# Altium PCB 1-LightingAndSolenoidValve.PcbDoc (part 3 of 3)
Units mm, origin at the board's own origin, x right, y up, seen from the top; angles counter-clockwise.
Board outline 272 x 85 mm, 2 copper layers (Top Layer, Bottom Layer); 366 components, 221 nets, 1073 pads, 653 vias.
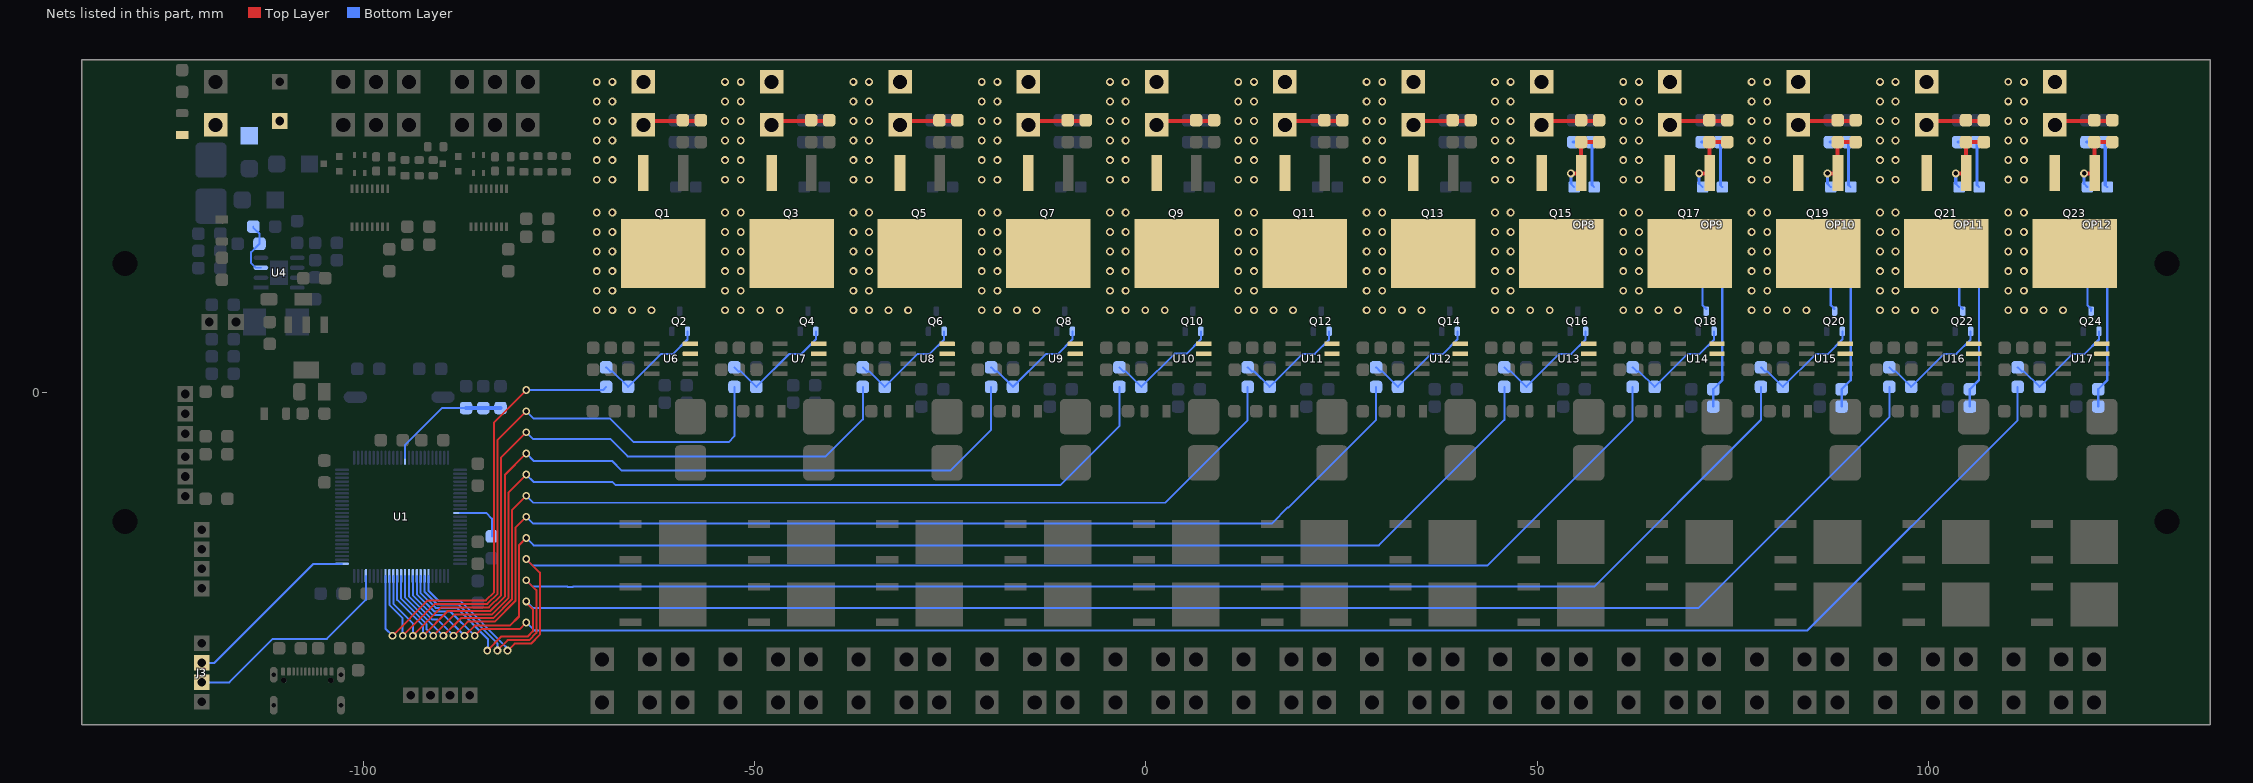
[diagram p3: the nets of this part, all layers, seen from the top]

## Via types
v1: diameter 1, hole 0.6, Top Layer to Bottom Layer, tented both sides, 648 vias
v2: diameter 1.2, hole 0.6, Top Layer to Bottom Layer, tented both sides, 4 vias
v3: diameter 1.2, hole 0.7, Top Layer to Bottom Layer, tented both sides, 1 vias

## Nets (pads, with @x,y where several pads share a name; then routed paths per layer and width w, separated by ;. In a path a pad name is that pad's centre, name@x,y a point inside that pad or via, vN(x,y) a via of type N, cw(c..) or ccw(c..) an arc to the next point about the centre after c; other vN are vias at no path point) (continued)
NetOP8_3: OP8.3 Q15.1 R82.2 R83.2 | length 9.6
  Top Layer w0.254: Q15.1@55.596,28 Q15.1@55.642,28.046 Q15.1@55.6,28.088
  Top Layer w0.5: v1(54.3,28) Q15.1@55.596,28 ; Q15.1@55.6,28.088 R82.2@55.6,32 R83.2@57.9,32
  Bottom Layer w0.254: OP8.3@54.3,26.68 OP8.3@54.73,26.25
  Bottom Layer w0.4: OP8.3@54.3,26.68 v1(54.3,28)
NetOP8_4: OP8.4 R86.1 R87.1 | length 8.2
  Bottom Layer w0.254: R86.1@56.9,32 R86.1@57.006,31.894 ; OP8.4@57.006,26.514 OP8.4@57.27,26.25
  Bottom Layer w0.4: R87.1@54.6,32 R86.1@56.9,32 ; OP8.4@57.006,26.514 R86.1@57.006,31.894
NetOP9_1: OP9.1 R93.1 R94.1 | length 18.7
  Bottom Layer w0.3: R94.1@72.5,-1.8 R93.1@72.5,0.4 73.67,1.57 OP9.1@73.67,16.45
NetOP9_2: OP9.2 Q18.3 | length 6
  Bottom Layer w0.3: OP9.2@71.13,16.45 71.13,11.146 Q18.3@71.6,10.676
NetOP9_3: OP9.3 Q17.1 R91.2 R92.2 | length 9.6
  Top Layer w0.254: Q17.1@71.996,28 Q17.1@72.042,28.046 Q17.1@72,28.088
  Top Layer w0.5: v1(70.7,28) Q17.1@71.996,28 ; Q17.1@72,28.088 R91.2@72,32 R92.2@74.3,32
  Bottom Layer w0.254: OP9.3@70.7,26.68 OP9.3@71.13,26.25
  Bottom Layer w0.4: OP9.3@70.7,26.68 v1(70.7,28)
NetOP9_4: OP9.4 R95.1 R96.1 | length 8.2
  Bottom Layer w0.254: R95.1@73.3,32 R95.1@73.406,31.894 ; OP9.4@73.406,26.514 OP9.4@73.67,26.25
  Bottom Layer w0.4: R96.1@71,32 R95.1@73.3,32 ; OP9.4@73.406,26.514 R95.1@73.406,31.894
NetOP10_1: OP10.1 R102.1 R103.1 | length 18.7
  Bottom Layer w0.3: R103.1@88.9,-1.8 R102.1@88.9,0.4 90.07,1.57 OP10.1@90.07,16.45
NetOP10_2: OP10.2 Q20.3 | length 6
  Bottom Layer w0.3: OP10.2@87.53,16.45 87.53,11.146 Q20.3@88,10.676
NetOP10_3: OP10.3 Q19.1 R100.2 R101.2 | length 9.6
  Top Layer w0.254: Q19.1@88.396,28 Q19.1@88.442,28.046 Q19.1@88.4,28.088
  Top Layer w0.5: v1(87.1,28) Q19.1@88.396,28 ; Q19.1@88.4,28.088 R100.2@88.4,32 R101.2@90.7,32
  Bottom Layer w0.254: OP10.3@87.1,26.68 OP10.3@87.53,26.25
  Bottom Layer w0.4: OP10.3@87.1,26.68 v1(87.1,28)
NetOP10_4: OP10.4 R104.1 R105.1 | length 8.2
  Bottom Layer w0.254: R104.1@89.7,32 R104.1@89.806,31.894 ; OP10.4@89.806,26.514 OP10.4@90.07,26.25
  Bottom Layer w0.4: R105.1@87.4,32 R104.1@89.7,32 ; OP10.4@89.806,26.514 R104.1@89.806,31.894
NetOP11_1: OP11.1 R111.1 R112.1 | length 18.7
  Bottom Layer w0.3: R112.1@105.3,-1.8 R111.1@105.3,0.4 106.47,1.57 OP11.1@106.47,16.45
NetOP11_2: OP11.2 Q22.3 | length 6
  Bottom Layer w0.3: OP11.2@103.93,16.45 103.93,11.146 Q22.3@104.4,10.676
NetOP11_3: OP11.3 Q21.1 R109.2 R110.2 | length 9.4
  Top Layer w0.5: v1(103.5,28) Q21.1@104.796,28 ; Q21.1@104.8,28.088 R109.2@104.8,32 R110.2@107.1,32
  Bottom Layer w0.254: OP11.3@103.5,26.68 OP11.3@103.93,26.25
  Bottom Layer w0.4: OP11.3@103.5,26.68 v1(103.5,28)
NetOP11_4: OP11.4 R113.1 R114.1 | length 8.2
  Bottom Layer w0.254: R113.1@106.1,32 R113.1@106.206,31.894 ; OP11.4@106.206,26.514 OP11.4@106.47,26.25
  Bottom Layer w0.4: R114.1@103.8,32 R113.1@106.1,32 ; OP11.4@106.206,26.514 R113.1@106.206,31.894
NetOP12_1: OP12.1 R120.1 R121.1 | length 18.7
  Bottom Layer w0.3: R121.1@121.7,-1.8 R120.1@121.7,0.4 122.87,1.57 OP12.1@122.87,16.45
NetOP12_2: OP12.2 Q24.3 | length 6.2
  Bottom Layer w0.254: Q24.3@120.8,10.4 Q24.3@120.8,10.676
  Bottom Layer w0.3: OP12.2@120.33,16.45 120.33,11.146 Q24.3@120.8,10.676
NetOP12_3: OP12.3 Q23.1 R118.2 R119.2 | length 9.6
  Top Layer w0.254: Q23.1@121.196,28 Q23.1@121.242,28.046 Q23.1@121.2,28.088
  Top Layer w0.5: v1(119.9,28) Q23.1@121.196,28 ; Q23.1@121.2,28.088 R118.2@121.2,32 R119.2@123.5,32
  Bottom Layer w0.254: OP12.3@119.9,26.68 OP12.3@120.33,26.25
  Bottom Layer w0.4: OP12.3@119.9,26.68 v1(119.9,28)
NetOP12_4: OP12.4 R122.1 R123.1 | length 8.2
  Bottom Layer w0.254: R122.1@122.5,32 R122.1@122.606,31.894 ; OP12.4@122.606,26.514 OP12.4@122.87,26.25
  Bottom Layer w0.4: R123.1@120.2,32 R122.1@122.5,32 ; OP12.4@122.606,26.514 R122.1@122.606,31.894
NetP1_1: P1.1 P1.2 Q1.3 R19.1 R20.1 | length 7.5
  Top Layer w0.254: R19.1@-57.009,34.691 R19.1@-56.9,34.8 R19.1@-57.009,34.691
  Top Layer w0.5: P1.2@-64.238,34.691 R19.1@-57.009,34.691
  other v1: -70.2,27.191 -68.2,27.191 -70.2,29.691 -68.2,29.691 -70.2,32.191 -68.2,32.191 -70.2,34.691 -68.2,34.691 -70.2,37.191 -68.2,37.191 -70.2,39.691 -68.2,39.691
NetP2_1: P2.1 P2.2 Q3.3 R28.1 R29.1 | length 7.5
  Top Layer w0.254: R28.1@-40.609,34.691 R28.1@-40.5,34.8 R28.1@-40.609,34.691
  Top Layer w0.5: P2.2@-47.838,34.691 R28.1@-40.609,34.691
  other v1: -53.8,27.191 -51.8,27.191 -53.8,29.691 -51.8,29.691 -53.8,32.191 -51.8,32.191 -53.8,34.691 -51.8,34.691 -53.8,37.191 -51.8,37.191 -53.8,39.691 -51.8,39.691
NetP3_1: P3.1 P3.2 Q5.3 R37.1 R38.1 | length 7.5
  Top Layer w0.254: R37.1@-24.209,34.691 R37.1@-24.1,34.8 R37.1@-24.209,34.691
  Top Layer w0.5: P3.2@-31.438,34.691 R37.1@-24.209,34.691
  other v1: -37.4,27.191 -35.4,27.191 -37.4,29.691 -35.4,29.691 -37.4,32.191 -35.4,32.191 -37.4,34.691 -35.4,34.691 -37.4,37.191 -35.4,37.191 -37.4,39.691 -35.4,39.691
NetP4_1: P4.1 P4.2 Q7.3 R46.1 R47.1 | length 7.5
  Top Layer w0.254: R47.1@-7.809,34.691 R47.1@-7.7,34.8 R47.1@-7.809,34.691
  Top Layer w0.5: P4.2@-15.038,34.691 R47.1@-7.809,34.691
  other v1: -21,27.191 -19,27.191 -21,29.691 -19,29.691 -21,32.191 -19,32.191 -21,34.691 -19,34.691 -21,37.191 -19,37.191 -21,39.691 -19,39.691
NetP5_1: P5.1 P5.2 Q9.3 R55.1 R56.1 | length 7.5
  Top Layer w0.254: R56.1@8.591,34.691 R56.1@8.7,34.8 R56.1@8.591,34.691
  Top Layer w0.5: P5.2@1.362,34.691 R56.1@8.591,34.691
  other v1: -4.6,27.191 -2.6,27.191 -4.6,29.691 -2.6,29.691 -4.6,32.191 -2.6,32.191 -4.6,34.691 -2.6,34.691 -4.6,37.191 -2.6,37.191 -4.6,39.691 -2.6,39.691
NetP6_1: P6.1 P6.2 Q11.3 R64.1 R65.1 | length 7.5
  Top Layer w0.254: R65.1@24.991,34.691 R65.1@25.1,34.8 R65.1@24.991,34.691
  Top Layer w0.5: P6.2@17.762,34.691 R65.1@24.991,34.691
  other v1: 11.8,27.191 13.8,27.191 11.8,29.691 13.8,29.691 11.8,32.191 13.8,32.191 11.8,34.691 13.8,34.691 11.8,37.191 13.8,37.191 11.8,39.691 13.8,39.691
NetP7_1: P7.1 P7.2 Q13.3 R73.1 R74.1 | length 7.5
  Top Layer w0.254: R74.1@41.391,34.691 R74.1@41.5,34.8 R74.1@41.391,34.691
  Top Layer w0.5: P7.2@34.162,34.691 R74.1@41.391,34.691
  other v1: 28.2,27.191 30.2,27.191 28.2,29.691 30.2,29.691 28.2,32.191 30.2,32.191 28.2,34.691 30.2,34.691 28.2,37.191 30.2,37.191 28.2,39.691 30.2,39.691
NetP8_1: P8.1 P8.2 Q15.3 R82.1 R83.1 | length 7.5
  Top Layer w0.254: R83.1@57.791,34.691 R83.1@57.9,34.8 R83.1@57.791,34.691
  Top Layer w0.5: P8.2@50.562,34.691 R83.1@57.791,34.691
  other v1: 44.6,27.191 46.6,27.191 44.6,29.691 46.6,29.691 44.6,32.191 46.6,32.191 44.6,34.691 46.6,34.691 44.6,37.191 46.6,37.191 44.6,39.691 46.6,39.691
NetP9_1: P9.1 P9.2 Q17.3 R91.1 R92.1 | length 7.5
  Top Layer w0.254: R92.1@74.191,34.691 R92.1@74.3,34.8 R92.1@74.191,34.691
  Top Layer w0.5: P9.2@66.962,34.691 R92.1@74.191,34.691
  other v1: 61,27.191 63,27.191 61,29.691 63,29.691 61,32.191 63,32.191 61,34.691 63,34.691 61,37.191 63,37.191 61,39.691 63,39.691
NetP10_1: P10.1 P10.2 Q19.3 R100.1 R101.1 | length 7.4
  Top Layer w0.254: R101.1@90.591,34.691 R101.1@90.7,34.8
  Top Layer w0.5: P10.2@83.362,34.691 R101.1@90.591,34.691
  other v1: 77.4,27.191 79.4,27.191 77.4,29.691 79.4,29.691 77.4,32.191 79.4,32.191 77.4,34.691 79.4,34.691 77.4,37.191 79.4,37.191 77.4,39.691 79.4,39.691
NetP11_1: P11.1 P11.2 Q21.3 R109.1 R110.1 | length 7.4
  Top Layer w0.254: R110.1@106.991,34.691 R110.1@107.1,34.8
  Top Layer w0.5: P11.2@99.762,34.691 R110.1@106.991,34.691
  other v1: 93.8,27.191 95.8,27.191 93.8,29.691 95.8,29.691 93.8,32.191 95.8,32.191 93.8,34.691 95.8,34.691 93.8,37.191 95.8,37.191 93.8,39.691 95.8,39.691
NetP12_1: P12.1 P12.2 Q23.3 R118.1 R119.1 | length 7.4
  Top Layer w0.254: R119.1@123.391,34.691 R119.1@123.5,34.8
  Top Layer w0.5: P12.2@116.162,34.691 R119.1@123.391,34.691
  other v1: 112.2,27.191 110.2,27.2 110.2,29.7 112.2,29.691 110.2,32.2 112.2,32.191 112.2,34.691 110.2,34.7 110.2,37.2 112.2,37.191 112.2,39.691 110.2,39.7
NetQ1_2: Q1.2 U6.3 U6.4
  other v1: -70.2,10.5 -68.2,10.5 -65.7,10.5 -63.2,10.5 -70.2,13 -68.2,13 -70.2,15.5 -68.2,15.5 -70.2,18 -68.2,18 -70.2,20.5 -68.2,20.5 -70.2,23 -68.2,23
NetQ2_1: Q2.1 R25.2 R26.1 | length 15
  Bottom Layer w0.254: R26.1@-69,3.2 -68.496,2.696 -68.196,2.696 R25.2@-66.2,0.7 -61.965,4.935 -60.428,4.935 -58.6,6.763 Q2.1@-58.6,7.8
NetQ3_2: Q3.2 U7.3 U7.4
  other v1: -53.8,10.5 -51.8,10.5 -49.3,10.5 -46.8,10.5 -53.8,13 -51.8,13 -53.8,15.5 -51.8,15.5 -53.8,18 -51.8,18 -53.8,20.5 -51.8,20.5 -53.8,23 -51.8,23
NetQ4_1: Q4.1 R34.2 R35.1 | length 15
  Bottom Layer w0.254: R35.1@-52.6,3.2 -52.096,2.696 -51.796,2.696 R34.2@-49.8,0.7 -45.565,4.935 -44.028,4.935 -42.2,6.763 Q4.1@-42.2,7.8
NetQ5_2: Q5.2 U8.3 U8.4
  other v1: -37.4,10.5 -35.4,10.5 -32.9,10.5 -30.4,10.5 -37.4,13 -35.4,13 -37.4,15.5 -35.4,15.5 -37.4,18 -35.4,18 -37.4,20.5 -35.4,20.5 -37.4,23 -35.4,23
NetQ6_1: Q6.1 R43.2 R44.1 | length 15
  Bottom Layer w0.254: R44.1@-36.2,3.2 -35.696,2.696 -35.396,2.696 R43.2@-33.4,0.7 -29.165,4.935 -27.628,4.935 -25.8,6.763 Q6.1@-25.8,7.8
NetQ7_2: Q7.2 U9.3 U9.4
  other v1: -21,10.5 -19,10.5 -16.5,10.5 -14,10.5 -21,13 -19,13 -21,15.5 -19,15.5 -21,18 -19,18 -21,20.5 -19,20.5 -21,23 -19,23
NetQ8_1: Q8.1 R52.2 R53.1 | length 15
  Bottom Layer w0.254: R53.1@-19.8,3.2 -19.296,2.696 -18.996,2.696 R52.2@-17,0.7 -12.765,4.935 -11.228,4.935 -9.4,6.763 Q8.1@-9.4,7.8
NetQ9_2: Q9.2 U10.3 U10.4
  other v1: -4.6,10.5 -2.6,10.5 -0.1,10.5 2.4,10.5 -4.6,13 -2.6,13 -4.6,15.5 -2.6,15.5 -4.6,18 -2.6,18 -4.6,20.5 -2.6,20.5 -4.6,23 -2.6,23
NetQ10_1: Q10.1 R61.2 R62.1 | length 15
  Bottom Layer w0.254: R62.1@-3.4,3.2 -2.896,2.696 -2.596,2.696 R61.2@-0.6,0.7 3.646,4.946 5.183,4.946 7,6.763 Q10.1@7,7.8
NetQ11_2: Q11.2 U11.3 U11.4
  other v1: 11.8,10.5 13.8,10.5 16.3,10.5 18.8,10.5 11.8,13 13.8,13 11.8,15.5 13.8,15.5 11.8,18 13.8,18 11.8,20.5 13.8,20.5 11.8,23 13.8,23
NetQ12_1: Q12.1 R70.2 R71.1 | length 15
  Bottom Layer w0.254: R71.1@13,3.2 13.504,2.696 13.804,2.696 R70.2@15.8,0.7 20.035,4.935 21.572,4.935 23.4,6.763 Q12.1@23.4,7.8
NetQ13_2: Q13.2 U12.3 U12.4
  other v1: 28.2,10.5 30.2,10.5 32.7,10.5 35.2,10.5 28.2,13 30.2,13 28.2,15.5 30.2,15.5 28.2,18 30.2,18 28.2,20.5 30.2,20.5 28.2,23 30.2,23
NetQ14_1: Q14.1 R79.2 R80.1 | length 15
  Bottom Layer w0.254: R80.1@29.4,3.2 29.904,2.696 30.204,2.696 R79.2@32.2,0.7 36.435,4.935 37.972,4.935 39.8,6.763 Q14.1@39.8,7.8
NetQ15_2: Q15.2 U13.3 U13.4
  other v1: 44.6,10.5 46.6,10.5 49.1,10.5 51.6,10.5 44.6,13 46.6,13 44.6,15.5 46.6,15.5 44.6,18 46.6,18 44.6,20.5 46.6,20.5 44.6,23 46.6,23
NetQ16_1: Q16.1 R88.2 R89.1 | length 15
  Bottom Layer w0.254: R89.1@45.8,3.2 46.304,2.696 46.604,2.696 R88.2@48.6,0.7 52.835,4.935 54.372,4.935 56.2,6.763 Q16.1@56.2,7.8
NetQ17_2: Q17.2 U14.3 U14.4
  other v1: 61,10.5 63,10.5 65.5,10.5 68,10.5 61,13 63,13 61,15.5 63,15.5 61,18 63,18 61,20.5 63,20.5 61,23 63,23
NetQ18_1: Q18.1 R97.2 R98.1 | length 15
  Bottom Layer w0.254: R98.1@62.2,3.2 62.704,2.696 63.004,2.696 R97.2@65,0.7 69.235,4.935 70.772,4.935 72.6,6.763 Q18.1@72.6,7.8
NetQ19_2: Q19.2 U15.3 U15.4
  other v1: 77.4,10.5 79.4,10.5 81.9,10.5 84.4,10.5 77.4,13 79.4,13 77.4,15.5 79.4,15.5 77.4,18 79.4,18 77.4,20.5 79.4,20.5 77.4,23 79.4,23
NetQ20_1: Q20.1 R106.2 R107.1 | length 15
  Bottom Layer w0.254: R107.1@78.6,3.2 79.104,2.696 79.404,2.696 R106.2@81.4,0.7 85.635,4.935 87.172,4.935 89,6.763 Q20.1@89,7.8
NetQ21_2: Q21.2 U16.3 U16.4
  other v1: 93.8,10.5 95.8,10.5 98.3,10.5 100.8,10.5 93.8,13 95.8,13 93.8,15.5 95.8,15.5 93.8,18 95.8,18 93.8,20.5 95.8,20.5 93.8,23 95.8,23
NetQ22_1: Q22.1 R115.2 R116.1 | length 15
  Bottom Layer w0.254: R116.1@95,3.2 95.504,2.696 95.804,2.696 R115.2@97.8,0.7 102.035,4.935 103.572,4.935 105.4,6.763 Q22.1@105.4,7.8
NetQ23_2: Q23.2 U17.3 U17.4
  other v1: 110.2,10.5 112.2,10.5 114.7,10.5 117.2,10.5 110.2,13 112.2,13 110.2,15.5 112.2,15.5 110.2,18 112.2,18 110.2,20.5 112.2,20.5 110.2,23 112.2,23
NetQ24_1: Q24.1 R124.2 R125.1 | length 15
  Bottom Layer w0.254: R125.1@111.4,3.2 111.904,2.696 112.204,2.696 R124.2@114.2,0.7 118.435,4.935 119.972,4.935 121.8,6.763 Q24.1@121.8,7.8
NetR1_1: R1.1 U1.37 | length 6.6
  Bottom Layer w0.254: U1.37@-87.65,-15.4 -84.342,-15.4 -83.6,-16.142 R1.1@-83.6,-18.4
NetR16_2: R16.2 R18.1 U4.3 | length 7
  Bottom Layer w0.254: R18.1@-114.1,21.2 -114.1,21.052 -113.3,20.252 R16.2@-113.3,19 -114.38,17.92 -114.38,16.533 -113.782,15.935 U4.3@-113.116,15.935
NetR25_1: R25.1 U1.67 | length 61.2
  Top Layer w0.254: v1(-96.299,-31.1) -91.775,-26.576 -84.365,-26.576 -83.316,-25.527 -83.316,-3.816 v1(-79.2,0.3)
  Bottom Layer w0.254: U1.67@-97.2,-23.45 -97.2,-30.199 v1(-96.299,-31.1) ; v1(-79.2,0.3) -69.4,0.3 R25.1@-69,0.7
NetR34_1: R34.1 U1.66 | length 82.4
  Top Layer w0.254: v1(-94.999,-31.099) -90.93,-27.03 -84.177,-27.03 -82.862,-25.715 -82.862,-6.062 v1(-79.2,-2.4)
  Bottom Layer w0.254: U1.66@-96.7,-23.45 -96.7,-27.142 -94.999,-28.843 v1(-94.999,-31.099) ; v1(-79.2,-2.4) -78.254,-3.346 -68.496,-3.346 -65.488,-6.354 -53.354,-6.354 -52.6,-5.6 R34.1@-52.6,0.7
NetR43_1: R43.1 U1.65 | length 94.6
  Top Layer w0.254: v1(-93.699,-31.109) -90.074,-27.484 -83.989,-27.484 -82.408,-25.903 -82.408,-8.308 v1(-79.2,-5.1)
  Bottom Layer w0.254: U1.65@-96.2,-23.45 -96.2,-27 -93.699,-29.501 v1(-93.699,-31.109) ; v1(-79.2,-5.1) -78.373,-5.927 -68.483,-5.927 -66.24,-8.17 -52.602,-8.17 -40.93,-8.17 -36.2,-3.44 R43.1@-36.2,0.7
NetR52_1: R52.1 U1.64 | length 108.9
  Top Layer w0.254: v1(-92.399,-31.1) -89.237,-27.938 -83.801,-27.938 -81.954,-26.091 -81.954,-10.554 v1(-79.2,-7.8)
  Bottom Layer w0.254: U1.64@-95.7,-23.45 -95.7,-26.5 -92.399,-29.801 v1(-92.399,-31.1) ; v1(-79.2,-7.8) -78.235,-8.765 -68.213,-8.765 -66.992,-9.986 -36.06,-9.986 -25.044,-9.986 -19.8,-4.742 R52.1@-19.8,0.7
NetR61_1: R61.1 U1.63 | length 122.2
  Top Layer w0.254: v1(-91.099,-31.1) -88.391,-28.392 -83.612,-28.392 -81.5,-26.28 -81.5,-12.8 v1(-79.2,-10.5)
  Bottom Layer w0.254: U1.63@-95.2,-23.45 -95.2,-26.358 -91.929,-29.629 -91.929,-30.27 v1(-91.099,-31.1) ; v1(-79.2,-10.5) -78.282,-11.418 -68.194,-11.418 -67.764,-11.848 -10.948,-11.848 -3.4,-4.3 R61.1@-3.4,0.7
NetR70_1: R70.1 U1.62 | length 135.6
  Top Layer w0.254: v1(-89.799,-31.1) -87.545,-28.846 -83.424,-28.846 -81.046,-26.468 -81.046,-15.046 v1(-79.2,-13.2)
  Bottom Layer w0.254: U1.62@-94.7,-23.45 -94.7,-26.216 -89.816,-31.1 v1(-89.799,-31.1) ; v1(-79.2,-13.2) -78.3,-14.1 2.443,-14.1 13,-3.543 R70.1@13,0.7
NetR79_1: R79.1 U1.61 | length 150.1
  Top Layer w0.254: v1(-88.499,-31.1) -86.699,-29.3 -83.236,-29.3 -80.592,-26.656 -80.592,-17.292 v1(-79.2,-15.9)
  Bottom Layer w0.254: U1.61@-94.2,-23.45 -94.2,-26.074 -91.274,-29 -90.599,-29 v1(-88.499,-31.1) ; v1(-79.2,-15.9) -78.373,-16.727 16.113,-16.727 18.14,-14.7 18.217,-14.7 29.4,-3.517 R79.1@29.4,0.7
NetR88_1: R88.1 U1.60 | length 165.9
  Top Layer w0.254: v1(-87.1,-31.1) -85.8,-29.8 -81.3,-29.8 -80.138,-28.638 -80.138,-19.538 v1(-79.2,-18.6)
  Bottom Layer w0.254: U1.60@-93.7,-23.45 -93.7,-25.932 -91.178,-28.454 -89.746,-28.454 v1(-87.1,-31.1) ; v1(-79.2,-18.6) -78.254,-19.546 29.771,-19.546 45.8,-3.517 R88.1@45.8,0.7
NetR97_1: R97.1 U1.56 | length 184.4
  Top Layer w0.254: v1(-81.6,-33) -80.7,-32.1 -78.6,-32.1 -77.465,-30.965 -77.465,-23.035 v1(-79.2,-21.3)
  Bottom Layer w0.254: U1.56@-91.7,-23.45 -91.7,-25.364 -90.426,-26.638 -87.662,-26.638 -81.819,-32.481 -81.819,-32.579 -81.6,-32.798 v1(-81.6,-33) ; v1(-79.2,-21.3) -78.356,-22.144 43.599,-22.144 62.2,-3.543 R97.1@62.2,0.7
NetR106_1: R106.1 U1.57 | length 199.4
  Top Layer w0.254: v1(-82.9,-33) -82.9,-32.946 -81.6,-31.646 -78.826,-31.646 -77.919,-30.739 -77.919,-25.281 v1(-79.2,-24)
  Bottom Layer w0.254: U1.57@-92.2,-23.45 -92.2,-25.506 -90.614,-27.092 -87.893,-27.092 -82.909,-32.076 -82.909,-32.991 v1(-82.9,-33) ; v1(-79.2,-24) -78.373,-24.827 -73.964,-24.827 -73.943,-24.848 -73.257,-24.848 -73.228,-24.819 57.298,-24.819 78.6,-3.517 R106.1@78.6,0.7
NetR115_1: R115.1 U1.58 | length 214.3
  Top Layer w0.254: v1(-84.2,-33) -84.2,-32.992 -82.4,-31.192 -79.014,-31.192 -78.373,-30.551 -78.373,-27.681 -79.2,-26.854 v1(-79.2,-26.7)
  Bottom Layer w0.254: U1.58@-92.7,-23.45 -92.7,-25.648 -90.802,-27.546 -88.081,-27.546 -84.1,-31.527 -84.1,-32.9 v1(-84.2,-33) ; v1(-79.2,-26.7) -78.344,-27.556 70.602,-27.556 95,-3.158 R115.1@95,0.7
NetR124_1: R124.1 U1.59 | length 225.6
  Top Layer w0.254: v1(-85.8,-31.1) -84.954,-30.254 -80.054,-30.254 v1(-79.2,-29.4)
  Bottom Layer w0.254: U1.59@-93.2,-23.45 -93.2,-25.79 -90.99,-28 -88.9,-28 v1(-85.8,-31.1) ; v1(-79.2,-29.4) -78.2,-30.4 84.543,-30.4 111.4,-3.543 R124.1@111.4,0.7
Pin: C28.1 D1.1 D2.1 POWER1.2
RESET: C4.2 C5.2 R4.1 U1.14 | length 15.8
  Bottom Layer w0.254: U1.14@-94.7,-8.35 -94.7,-6.7 -90,-2 C4.2@-86.9,-2
  Bottom Layer w0.5: C4.2@-86.9,-2 C5.2@-84.7,-2 R4.1@-82.5,-2
SWD_CLK: J3.3 U1.76 | length 23.2
  Bottom Layer w0.254: J3.3@-120.7,-34.55 -119.05,-34.55 -106.4,-21.9 U1.76@-102.75,-21.9
SWD_IO: J3.2 U1.72 | length 28.4
  Bottom Layer w0.254: J3.2@-120.7,-37.05 -117.15,-37.05 -111.6,-31.5 -104.7,-31.5 -99.7,-26.5 U1.72@-99.7,-23.45
pads on no net: B1.2 B1.3 B1.13 B1.16 B2.2 B2.3 B2.13 B2.16 J4. J4.A5 J4.A8 J4.B5 J4.B8 J4.SH1 J4.SH2 J4.SH3 J4.SH4 U1.1 U1.2 U1.3 U1.4 U1.5 U1.6 U1.7 U1.8 U1.9 U1.33 U1.34 U1.35 U1.36 U1.38 U1.39 U1.40 U1.41 U1.42 U1.43 U1.44 U1.45 U1.46 U1.47 U1.48 U1.53 U1.54 U1.55 U1.77 U1.78 U1.79 U1.80 U1.83 U1.84 U1.85 U1.86 U1.87 U1.88 U1.92 U1.95 U1.96 U1.97 U1.98 U4.4

## Polygon pours and split planes (outlines as drawn)
NetFH12_2 on Top Layer "NETFH12_2_L01_P228" (solid, remove dead copper, pour order 228): 104.8,4.1 107.8,4.1 107.8,-5.4 103.5,-5.4 103.5,0.9 104.8,0.9
1GND on Top Layer "1GND_L01_P322" (solid, remove dead copper, pour order 322): -71.1,-4.8 -71.1,-42.5 -61.6,-42.5 -61.6,-30.8 -63.9,-30.8 -63.9,-15.5 -62,-15.5 -62,-4.8
NetD8_4 on Top Layer "NETD8_4_L01_P321" (solid, remove dead copper, pour order 321): -60.8,-42.5 -56.2,-42.5 -56.2,-6.7 -60.8,-6.7
2GND on Top Layer "2GND_L01_P320" (solid, remove dead copper, pour order 320): -54.7,-4.8 -54.7,-42.5 -45.2,-42.5 -45.2,-30.8 -47.5,-30.8 -47.5,-15.5 -45.6,-15.5 -45.6,-4.8
NetD11_4 on Top Layer "NETD11_4_L01_P319" (solid, remove dead copper, pour order 319): -44.4,-42.5 -39.8,-42.5 -39.8,-6.7 -44.4,-6.7
3GND on Top Layer "3GND_L01_P318" (solid, remove dead copper, pour order 318): -38.3,-4.8 -38.3,-42.5 -28.8,-42.5 -28.8,-30.8 -31.1,-30.8 -31.1,-15.5 -29.2,-15.5 -29.2,-4.8
NetD14_4 on Top Layer "NETD14_4_L01_P317" (solid, remove dead copper, pour order 317): -28,-42.5 -23.4,-42.5 -23.4,-6.7 -28,-6.7
4GND on Top Layer "4GND_L01_P316" (solid, remove dead copper, pour order 316): -21.9,-4.8 -21.9,-42.5 -12.4,-42.5 -12.4,-30.8 -14.7,-30.8 -14.7,-15.5 -12.8,-15.5 -12.8,-4.8
NetD17_4 on Top Layer "NETD17_4_L01_P315" (solid, remove dead copper, pour order 315): -11.6,-42.5 -7,-42.5 -7,-6.7 -11.6,-6.7
5GND on Top Layer "5GND_L01_P314" (solid, remove dead copper, pour order 314): -5.5,-4.8 -5.5,-42.5 4,-42.5 4,-30.8 1.7,-30.8 1.7,-15.5 3.6,-15.5 3.6,-4.8
NetD20_4 on Top Layer "NETD20_4_L01_P313" (solid, remove dead copper, pour order 313): 4.8,-42.5 9.4,-42.5 9.4,-6.7 4.8,-6.7
6GND on Top Layer "6GND_L01_P312" (solid, remove dead copper, pour order 312): 10.9,-4.8 10.9,-42.5 20.4,-42.5 20.4,-30.8 18.1,-30.8 18.1,-15.5 20,-15.5 20,-4.8
NetD23_4 on Top Layer "NETD23_4_L01_P311" (solid, remove dead copper, pour order 311): 21.2,-42.5 25.8,-42.5 25.8,-6.7 21.2,-6.7
7GND on Top Layer "7GND_L01_P310" (solid, remove dead copper, pour order 310): 27.3,-4.8 27.3,-42.5 36.8,-42.5 36.8,-30.8 34.5,-30.8 34.5,-15.5 36.4,-15.5 36.4,-4.8
NetD26_4 on Top Layer "NETD26_4_L01_P309" (solid, remove dead copper, pour order 309): 37.6,-42.5 42.2,-42.5 42.2,-6.7 37.6,-6.7
8GND on Top Layer "8GND_L01_P308" (solid, remove dead copper, pour order 308): 43.7,-4.8 43.7,-42.5 53.2,-42.5 53.2,-30.8 50.9,-30.8 50.9,-15.5 52.8,-15.5 52.8,-4.8
NetD29_4 on Top Layer "NETD29_4_L01_P307" (solid, remove dead copper, pour order 307): 54,-42.5 58.6,-42.5 58.6,-6.7 54,-6.7
9GND on Top Layer "9GND_L01_P306" (solid, remove dead copper, pour order 306): 60.1,-4.8 60.1,-42.5 69.6,-42.5 69.6,-30.8 67.3,-30.8 67.3,-15.5 69.2,-15.5 69.2,-4.8
NetD32_4 on Top Layer "NETD32_4_L01_P305" (solid, remove dead copper, pour order 305): 70.4,-42.5 75,-42.5 75,-6.7 70.4,-6.7
10GND on Top Layer "10GND_L01_P304" (solid, remove dead copper, pour order 304): 76.5,-4.8 76.5,-42.5 86,-42.5 86,-30.8 83.7,-30.8 83.7,-15.5 85.6,-15.5 85.6,-4.8
NetD35_4 on Top Layer "NETD35_4_L01_P303" (solid, remove dead copper, pour order 303): 86.8,-42.5 91.4,-42.5 91.4,-6.7 86.8,-6.7
11GND on Top Layer "11GND_L01_P302" (solid, remove dead copper, pour order 302): 92.9,-4.8 92.9,-42.5 102.4,-42.5 102.4,-30.8 100.1,-30.8 100.1,-15.5 102,-15.5 102,-4.8
NetD38_4 on Top Layer "NETD38_4_L01_P301" (solid, remove dead copper, pour order 301): 103.2,-42.5 107.8,-42.5 107.8,-6.7 103.2,-6.7
12GND on Top Layer "12GND_L01_P300" (solid, remove dead copper, pour order 300): 109.3,-4.8 109.3,-42.5 118.8,-42.5 118.8,-30.8 116.5,-30.8 116.5,-15.5 118.4,-15.5 118.4,-4.8
NetD41_4 on Top Layer "NETD41_4_L01_P299" (solid, remove dead copper, pour order 299): 119.6,-42.5 124.2,-42.5 124.2,-6.7 119.6,-6.7
MCUGND on Top Layer "MCUGND_L01_P214" (solid, remove dead copper, pour order 214): -124.2,42.5 -106.3,42.5 -106.3,25.3 -73,25.3 -73,-42.5 -124.2,-42.5
NetQ1_2 on Top Layer "NETQ1_2_L01_P250" (solid, remove dead copper, pour order 250): -71.7,23.6 -56.2,23.6 -56.2,4.6 -59.2,4.6 -59.2,8.3 -71.7,8.3
NetFH2_2 on Top Layer "NETFH2_2_L01_P249" (solid, remove dead copper, pour order 249): -59.2,4.1 -56.2,4.1 -56.2,-5.4 -60.5,-5.4 -60.5,0.9 -59.2,0.9
NetQ3_2 on Top Layer "NETQ3_2_L01_P248" (solid, remove dead copper, pour order 248): -55.3,23.6 -39.8,23.6 -39.8,4.6 -42.8,4.6 -42.8,8.3 -55.3,8.3
NetFH3_2 on Top Layer "NETFH3_2_L01_P247" (solid, remove dead copper, pour order 247): -42.8,4.1 -39.8,4.1 -39.8,-5.4 -44.1,-5.4 -44.1,0.9 -42.8,0.9
NetQ5_2 on Top Layer "NETQ5_2_L01_P246" (solid, remove dead copper, pour order 246): -38.9,23.6 -23.4,23.6 -23.4,4.6 -26.4,4.6 -26.4,8.3 -38.9,8.3
NetFH4_2 on Top Layer "NETFH4_2_L01_P245" (solid, remove dead copper, pour order 245): -26.4,4.1 -23.4,4.1 -23.4,-5.4 -27.7,-5.4 -27.7,0.9 -26.4,0.9
NetQ7_2 on Top Layer "NETQ7_2_L01_P244" (solid, remove dead copper, pour order 244): -22.5,23.6 -7,23.6 -7,4.6 -10,4.6 -10,8.3 -22.5,8.3
NetFH5_2 on Top Layer "NETFH5_2_L01_P243" (solid, remove dead copper, pour order 243): -10,4.1 -7,4.1 -7,-5.4 -11.3,-5.4 -11.3,0.9 -10,0.9
NetQ9_2 on Top Layer "NETQ9_2_L01_P242" (solid, remove dead copper, pour order 242): -6.1,23.6 9.4,23.6 9.4,4.6 6.4,4.6 6.4,8.3 -6.1,8.3
NetFH6_2 on Top Layer "NETFH6_2_L01_P241" (solid, remove dead copper, pour order 241): 6.4,4.1 9.4,4.1 9.4,-5.4 5.1,-5.4 5.1,0.9 6.4,0.9
NetQ11_2 on Top Layer "NETQ11_2_L01_P240" (solid, remove dead copper, pour order 240): 10.3,23.6 25.8,23.6 25.8,4.6 22.8,4.6 22.8,8.3 10.3,8.3
NetFH7_2 on Top Layer "NETFH7_2_L01_P239" (solid, remove dead copper, pour order 239): 22.8,4.1 25.8,4.1 25.8,-5.4 21.5,-5.4 21.5,0.9 22.8,0.9
NetQ13_2 on Top Layer "NETQ13_2_L01_P238" (solid, remove dead copper, pour order 238): 26.7,23.6 42.2,23.6 42.2,4.6 39.2,4.6 39.2,8.3 26.7,8.3
NetFH8_2 on Top Layer "NETFH8_2_L01_P237" (solid, remove dead copper, pour order 237): 39.2,4.1 42.2,4.1 42.2,-5.4 37.9,-5.4 37.9,0.9 39.2,0.9
NetQ15_2 on Top Layer "NETQ15_2_L01_P236" (solid, remove dead copper, pour order 236): 43.1,23.6 58.6,23.6 58.6,4.6 55.6,4.6 55.6,8.3 43.1,8.3
NetFH9_2 on Top Layer "NETFH9_2_L01_P235" (solid, remove dead copper, pour order 235): 55.6,4.1 58.6,4.1 58.6,-5.4 54.3,-5.4 54.3,0.9 55.6,0.9
NetQ17_2 on Top Layer "NETQ17_2_L01_P234" (solid, remove dead copper, pour order 234): 59.5,23.6 75,23.6 75,4.6 72,4.6 72,8.3 59.5,8.3
NetFH10_2 on Top Layer "NETFH10_2_L01_P233" (solid, remove dead copper, pour order 233): 72,4.1 75,4.1 75,-5.4 70.7,-5.4 70.7,0.9 72,0.9
NetQ19_2 on Top Layer "NETQ19_2_L01_P232" (solid, remove dead copper, pour order 232): 75.9,23.6 91.4,23.6 91.4,4.6 88.4,4.6 88.4,8.3 75.9,8.3
NetFH11_2 on Top Layer "NETFH11_2_L01_P231" (solid, remove dead copper, pour order 231): 88.4,4.1 91.4,4.1 91.4,-5.4 87.1,-5.4 87.1,0.9 88.4,0.9
NetP11_1 on Top Layer "NETP11_1_L01_P230" (solid, remove dead copper, pour order 230): 92.4,42.5 102.5,42.5 102.5,25.1 92.4,25.1
NetQ21_2 on Top Layer "NETQ21_2_L01_P229" (solid, remove dead copper, pour order 229): 92.3,23.6 107.8,23.6 107.8,4.6 104.8,4.6 104.8,8.3 92.3,8.3
NetJ5_1 on Top Layer "NETJ5_1_L01_P224" (solid, remove dead copper, pour order 224): -104.1,42.5 -104.1,32.1 -101.1,32.1 -101.1,42.5
NetJ5_2 on Top Layer "NETJ5_2_L01_P223" (solid, remove dead copper, pour order 223): -99.9,42.5 -99.9,32.1 -96.9,32.1 -96.9,42.5
NetJ6_1 on Top Layer "NETJ6_1_L01_P192" (solid, remove dead copper, pour order 192): -88.9,42.5 -88.9,32.1 -85.9,32.1 -85.9,42.5
NetJ6_2 on Top Layer "NETJ6_2_L01_P191" (solid, remove dead copper, pour order 191): -84.7,42.5 -84.7,32.1 -81.7,32.1 -81.7,42.5
MGND on Top Layer "MGND_L01_P218" (solid, remove dead copper, pour order 218): -95.7,42.5 -95.7,32.1 -89.6,32.1 -89.6,42.5
MGND on Top Layer "MGND_L01_P216" (solid, remove dead copper, pour order 216): -80.5,42.5 -80.5,32.1 -73,32.1 -73,42.5
3v3MCU on Top Layer "3V3MCU_L01_P210" (solid, remove dead copper, pour order 210): -108.7,15.5 -106.6,15.5 -106.6,7.1 -105.7,7.1 -105.7,1.8 -107.5,1.8 -107.5,-1.3 -109,-1.3 -109,1.8 -110.8,1.8 -110.8,7.1 -108.7,7.1
5V on Top Layer "5V_L01_P208" (solid, remove dead copper, pour order 208): -116.3,12.7 -116.3,8.4 -109.1,8.4 -109.1,12.7
Pin on Top Layer "PIN_L01_P200" (solid, remove dead copper, pour order 200): -124.3,33.2 -122.1,33.2 -122.1,37.1 -109.7,37.1 -109.7,32.4 -124.3,32.4
MCUGND on Top Layer "MCUGND_L01_P199" (solid, remove dead copper, pour order 199): -124.1,42.5 -106.3,42.5 -106.3,37.3 -122.2,37.3 -122.2,40.6 -124.1,40.6
NetQ23_2 on Top Layer "NETQ23_2_L01_P163" (solid, remove dead copper, pour order 163): 108.7,23.6 124.2,23.6 124.2,4.6 121.2,4.6 121.2,8.3 108.7,8.3
NetFH13_2 on Top Layer "NETFH13_2_L01_P162" (solid, remove dead copper, pour order 162): 121.2,4.1 124.2,4.1 124.2,-5.4 119.9,-5.4 119.9,0.9 121.2,0.9
NetP1_1 on Top Layer "NETP1_1_L01_P071" (solid, remove dead copper, pour order 71): -71.6,42.5 -61.5,42.5 -61.5,25.1 -71.6,25.1
NetP2_1 on Top Layer "NETP2_1_L01_P070" (solid, remove dead copper, pour order 70): -55.2,42.5 -45.1,42.5 -45.1,25.1 -55.2,25.1
NetP3_1 on Top Layer "NETP3_1_L01_P069" (solid, remove dead copper, pour order 69): -38.8,42.5 -28.7,42.5 -28.7,25.1 -38.8,25.1
NetP4_1 on Top Layer "NETP4_1_L01_P068" (solid, remove dead copper, pour order 68): -22.4,42.5 -12.3,42.5 -12.3,25.1 -22.4,25.1
NetP5_1 on Top Layer "NETP5_1_L01_P067" (solid, remove dead copper, pour order 67): -6,42.5 4.1,42.5 4.1,25.1 -6,25.1
NetP6_1 on Top Layer "NETP6_1_L01_P066" (solid, remove dead copper, pour order 66): 10.4,42.5 20.5,42.5 20.5,25.1 10.4,25.1
NetP7_1 on Top Layer "NETP7_1_L01_P065" (solid, remove dead copper, pour order 65): 26.8,42.5 36.9,42.5 36.9,25.1 26.8,25.1
NetP8_1 on Top Layer "NETP8_1_L01_P064" (solid, remove dead copper, pour order 64): 43.2,42.5 53.3,42.5 53.3,25.1 43.2,25.1
NetP9_1 on Top Layer "NETP9_1_L01_P063" (solid, remove dead copper, pour order 63): 59.6,42.5 69.7,42.5 69.7,25.1 59.6,25.1
NetP10_1 on Top Layer "NETP10_1_L01_P062" (solid, remove dead copper, pour order 62): 76,42.5 86.1,42.5 86.1,25.1 76,25.1
NetP12_1 on Top Layer "NETP12_1_L01_P060" (solid, remove dead copper, pour order 60): 108.8,42.5 118.9,42.5 118.9,25.1 108.8,25.1
MCUGND on Bottom Layer "MCUGND_L02_P213" (solid, remove dead copper, pour order 213): -124.2,42.5 -105.6,42.5 -105.6,25.8 -73.2,25.8 -73.2,-42.5 -124.2,-42.5
MCUGND on Bottom Layer "NONET_L01_P-001" (solid, remove dead copper, pour order 286): -74.9,7.8 -74.9,4.6 -63.7,4.6 -62.5,5.8 -61.1,5.8 -60.3,6.6 -60.3,7.8
NetQ1_2 on Bottom Layer "NETQ1_2_L02_P285" (solid, remove dead copper, pour order 285): -70.7,23.6 -62.3,23.6 -62.3,9.4 -70.7,9.4
NetP1_1 on Bottom Layer "NETP1_1_L02_P284" (solid, remove dead copper, pour order 284): -70.7,42.5 -61.5,42.5 -61.5,25.1 -70.7,25.1
MCUGND on Bottom Layer "NONET_L01_P-001" (solid, remove dead copper, pour order 283): -50.4,7.8 -53.6,4.6 -47.3,4.6 -46.1,5.8 -44.7,5.8 -43.9,6.6 -43.9,7.8
NetQ3_2 on Bottom Layer "NETQ3_2_L02_P282" (solid, remove dead copper, pour order 282): -54.3,23.6 -45.9,23.6 -45.9,9.4 -54.3,9.4
NetP2_1 on Bottom Layer "NETP2_1_L02_P281" (solid, remove dead copper, pour order 281): -54.3,42.5 -45.1,42.5 -45.1,25.1 -54.3,25.1
MCUGND on Bottom Layer "NONET_L01_P-001" (solid, remove dead copper, pour order 280): -34,7.8 -37.2,4.6 -30.9,4.6 -29.7,5.8 -28.3,5.8 -27.5,6.6 -27.5,7.8
NetQ5_2 on Bottom Layer "NETQ5_2_L02_P279" (solid, remove dead copper, pour order 279): -37.9,23.6 -29.5,23.6 -29.5,9.4 -37.9,9.4
NetP3_1 on Bottom Layer "NETP3_1_L02_P278" (solid, remove dead copper, pour order 278): -37.9,42.5 -28.7,42.5 -28.7,25.1 -37.9,25.1
MCUGND on Bottom Layer "NONET_L01_P-001" (solid, remove dead copper, pour order 277): -17.6,7.8 -20.8,4.6 -14.5,4.6 -13.3,5.8 -11.9,5.8 -11.1,6.6 -11.1,7.8
NetQ7_2 on Bottom Layer "NETQ7_2_L02_P276" (solid, remove dead copper, pour order 276): -21.5,23.6 -13.1,23.6 -13.1,9.4 -21.5,9.4
NetP4_1 on Bottom Layer "NETP4_1_L02_P275" (solid, remove dead copper, pour order 275): -21.5,42.5 -12.3,42.5 -12.3,25.1 -21.5,25.1
MCUGND on Bottom Layer "NONET_L01_P-001" (solid, remove dead copper, pour order 274): -1.2,7.8 -4.4,4.6 1.9,4.6 3.1,5.8 4.5,5.8 5.3,6.6 5.3,7.8
NetQ9_2 on Bottom Layer "NETQ9_2_L02_P273" (solid, remove dead copper, pour order 273): -5.1,23.6 3.3,23.6 3.3,9.4 -5.1,9.4
NetP5_1 on Bottom Layer "NETP5_1_L02_P272" (solid, remove dead copper, pour order 272): -5.1,42.5 4.1,42.5 4.1,25.1 -5.1,25.1
MCUGND on Bottom Layer "NONET_L01_P-001" (solid, remove dead copper, pour order 268): 15.2,7.8 12,4.6 18.3,4.6 19.5,5.8 20.9,5.8 21.7,6.6 21.7,7.8
NetQ11_2 on Bottom Layer "NETQ11_2_L02_P267" (solid, remove dead copper, pour order 267): 11.3,23.6 19.7,23.6 19.7,9.4 11.3,9.4
NetP6_1 on Bottom Layer "NETP6_1_L02_P266" (solid, remove dead copper, pour order 266): 11.3,42.5 20.5,42.5 20.5,25.1 11.3,25.1
MCUGND on Bottom Layer "NONET_L01_P-001" (solid, remove dead copper, pour order 265): 31.6,7.8 28.4,4.6 34.7,4.6 35.9,5.8 37.3,5.8 38.1,6.6 38.1,7.8
NetQ13_2 on Bottom Layer "NETQ13_2_L02_P264" (solid, remove dead copper, pour order 264): 27.7,23.6 36.1,23.6 36.1,9.4 27.7,9.4
NetP7_1 on Bottom Layer "NETP7_1_L02_P263" (solid, remove dead copper, pour order 263): 27.7,42.5 36.9,42.5 36.9,25.1 27.7,25.1
MCUGND on Bottom Layer "NONET_L01_P-001" (solid, remove dead copper, pour order 262): 48,7.8 44.8,4.6 51.1,4.6 52.3,5.8 53.7,5.8 54.5,6.6 54.5,7.8
NetQ15_2 on Bottom Layer "NETQ15_2_L02_P261" (solid, remove dead copper, pour order 261): 44.1,23.6 52.5,23.6 52.5,9.4 44.1,9.4
NetP8_1 on Bottom Layer "NETP8_1_L02_P260" (solid, remove dead copper, pour order 260): 44.1,42.5 53.3,42.5 53.3,25.1 44.1,25.1
MCUGND on Bottom Layer "NONET_L01_P-001" (solid, remove dead copper, pour order 259): 64.4,7.8 61.2,4.6 67.5,4.6 68.7,5.8 70.1,5.8 70.9,6.6 70.9,7.8
NetQ17_2 on Bottom Layer "NETQ17_2_L02_P258" (solid, remove dead copper, pour order 258): 60.5,23.6 68.9,23.6 68.9,9.4 60.5,9.4
NetP9_1 on Bottom Layer "NETP9_1_L02_P257" (solid, remove dead copper, pour order 257): 60.5,42.5 69.7,42.5 69.7,25.1 60.5,25.1
MCUGND on Bottom Layer "NONET_L01_P-001" (solid, remove dead copper, pour order 256): 80.8,7.8 77.6,4.6 83.9,4.6 85.1,5.8 86.5,5.8 87.3,6.6 87.3,7.8
NetQ19_2 on Bottom Layer "NETQ19_2_L02_P255" (solid, remove dead copper, pour order 255): 76.9,23.6 85.3,23.6 85.3,9.4 76.9,9.4
NetP10_1 on Bottom Layer "NETP10_1_L02_P254" (solid, remove dead copper, pour order 254): 76.9,42.5 86.1,42.5 86.1,25.1 76.9,25.1
MCUGND on Bottom Layer "NONET_L01_P-001" (solid, remove dead copper, pour order 253): 97.2,7.8 94,4.6 100.3,4.6 101.5,5.8 102.9,5.8 103.7,6.6 103.7,7.8
NetQ21_2 on Bottom Layer "NETQ21_2_L02_P252" (solid, remove dead copper, pour order 252): 93.3,23.6 101.7,23.6 101.7,9.4 93.3,9.4
NetP11_1 on Bottom Layer "NETP11_1_L02_P251" (solid, remove dead copper, pour order 251): 93.3,42.5 102.5,42.5 102.5,25.1 93.3,25.1
MCUGND on Bottom Layer "NONET_L01_P-001" (solid, remove dead copper, pour order 227): 113.6,7.8 110.4,4.6 116.7,4.6 117.9,5.8 119.3,5.8 120.1,6.6 120.1,7.8
NetJ5_1 on Bottom Layer "NETJ5_1_L02_P226" (solid, remove dead copper, pour order 226): -104.1,42.5 -104.1,32.1 -101.1,32.1 -101.1,42.5
NetJ5_2 on Bottom Layer "NETJ5_2_L02_P225" (solid, remove dead copper, pour order 225): -99.9,42.5 -99.9,32.1 -96.9,32.1 -96.9,42.5
NetJ6_1 on Bottom Layer "NETJ6_1_L02_P222" (solid, remove dead copper, pour order 222): -88.9,42.5 -88.9,32.1 -85.9,32.1 -85.9,42.5
NetJ6_2 on Bottom Layer "NETJ6_2_L02_P221" (solid, remove dead copper, pour order 221): -84.7,42.5 -84.7,32.1 -81.7,32.1 -81.7,42.5
MGND on Bottom Layer "MGND_L02_P217" (solid, remove dead copper, pour order 217): -95.7,42.5 -95.7,32.1 -89.6,32.1 -89.6,42.5
MGND on Bottom Layer "MGND_L02_P215" (solid, remove dead copper, pour order 215): -80.5,42.5 -80.5,32.1 -73,32.1 -73,42.5
MCUGND on Bottom Layer "MCUGND_L02_P211" (solid, remove dead copper, pour order 211): -108.9,43.1 -105.6,43.1 -105.6,23.2 -105.6,21.3 -109.5,21.3 -109.5,12.2 -120.8,12.2 -120.8,13.9 -111.876,13.9 -111.876,26.5 -108.9,26.5
MCUGND on Bottom Layer "MCUGND_L02_P207" (solid, remove dead copper, pour order 207): -116.9,42.5 -116.9,37.4 -122.1,37.4 -122.1,21.3 -120.5,21.3 -120.5,14 -118.8,14 -118.8,1.4 -124.3,1.4 -124.3,42.5
5V on Bottom Layer "5V_L02_P205" (solid, remove dead copper, pour order 205): -117.2,12.2 -117.2,1.4 -112.4,1.4 -112.4,12.2
NetC30_2 on Bottom Layer "NETC30_2_L02_P204" (solid, remove dead copper, pour order 204): -110,13.7 -110,5.5 -105.2,5.5 -105.2,13.7
DCin on Bottom Layer "DCIN_L02_P203" (solid, remove dead copper, pour order 203): -122.1,26.7 -114.9,26.7 -114.9,22.4 -115.5,22.4 -115.5,15.3 -112.1,15.3 -112.1,14 -118.9,14 -118.9,21.3 -122.1,21.3
NetD1_2 on Bottom Layer "NETD1_2_L02_P202" (solid, remove dead copper, pour order 202): -110.5,29.2 -110.5,27 -122.1,27 -122.1,32.1 -116.9,32.1 -116.9,29.2
MCUGND on Bottom Layer "MCUGND_L02_P201" (solid, remove dead copper, pour order 201): -122,42.5 -122,37.1 -109.4,37.1 -109.4,27.1 -105.6,27.1 -105.6,42.5
Pin on Bottom Layer "PIN_L02_P198" (solid, remove dead copper, pour order 198): -122.1,33.2 -122.1,37.1 -109.8,37.1 -109.8,32.4 -122.1,32.4
NetQ23_2 on Bottom Layer "NETQ23_2_L02_P160" (solid, remove dead copper, pour order 160): 109.7,23.6 118.1,23.6 118.1,9.4 109.7,9.4
NetP12_1 on Bottom Layer "NETP12_1_L02_P048" (solid, remove dead copper, pour order 48): 109.7,42.5 118.9,42.5 118.9,25.1 109.7,25.1

## Keep-outs
Keep-Out Layer:
  the board outline again, w0.254

## Other copper
Top Layer:
  pour cut-out: -101.2,-7.7 -101.2,-9 -89.2,-9 -89.2,-7.7
  pour cut-out: -103.4,-21.9 -102.1,-21.9 -102.1,-9.9 -103.4,-9.9
  pour cut-out: -89.2,-24.1 -89.2,-22.8 -101.2,-22.8 -101.2,-24.1
  pour cut-out: -87,-9.9 -88.3,-9.9 -88.3,-21.9 -87,-21.9
Bottom Layer:
  pour cut-out: -89.2,-24.1 -89.2,-22.8 -101.2,-22.8 -101.2,-24.1
  pour cut-out: -87,-9.9 -88.3,-9.9 -88.3,-21.9 -87,-21.9
  pour cut-out: -103.4,-21.9 -102.1,-21.9 -102.1,-9.9 -103.4,-9.9
  pour cut-out: -101.2,-7.7 -101.2,-9 -89.2,-9 -89.2,-7.7
  pour cut-out: -113.925,10.7 -113.925,7.3 -108.475,7.3 -108.475,10.7

## Silkscreen, mask and mechanical layers (free items; w line width, h text height)
Top Overlay:
  text "+" at -68.4,35.554 h1.52 r90
  text "+" at -52,35.554 h1.52 r90
  text "+" at -35.6,35.554 h1.52 r90
  text "+" at -19.2,35.554 h1.52 r90
  text "+" at -2.8,35.554 h1.52 r90
  text "+" at 13.6,35.554 h1.52 r90
  text "+" at 30,35.554 h1.52 r90
  text "+" at 46.4,35.554 h1.52 r90
  text "+" at 62.8,35.554 h1.52 r90
  text "+" at 79.2,35.554 h1.52 r90
  text "+" at 95.6,35.554 h1.52 r90
  text "+" at 112,35.554 h1.52 r90
  text "+   -" at -126.654,33.354 h1.52 r90
  text "BOOT" at -120.946,-3.546 h1.52
  text "Mode" at -120.846,-11.646 h1.52
  text "GND" at -117.15,-17.4 h0.8
  text "MOSI" at -117.15,-19.9 h0.8
  text "MISO" at -117.15,-22.4 h0.8
  text "SCK" at -117.15,-24.9 h0.8
  text "-" at -69.154,-30.792 h1.52 r180
  text "-" at -52.754,-30.792 h1.52 r180
  text "-" at -36.354,-30.792 h1.52 r180
  text "-" at -19.954,-30.792 h1.52 r180
  text "-" at -3.554,-30.792 h1.52 r180
  text "-" at 12.846,-30.792 h1.52 r180
  text "-" at 29.246,-30.792 h1.52 r180
  text "-" at 45.646,-30.792 h1.52 r180
  text "-" at 62.046,-30.792 h1.52 r180
  text "-" at 78.446,-30.792 h1.52 r180
  text "-" at 94.846,-30.792 h1.52 r180
  text "-" at 111.246,-30.792 h1.52 r180
  text "GND" at -117.15,-31.9 h0.8
  text "CLK" at -117.15,-34.4 h0.8
  text "3v3" at -86.6,-34.85 h0.8 r90
  text "GND" at -93.95,-35 h0.8 r90
  text "RX" at -91.5,-35 h0.8 r90
  text "TX" at -89.05,-35 h0.8 r90
  text "IO" at -117.15,-36.9 h0.8
  text "3v3" at -117.15,-39.4 h0.8
Top Paste:
  drawing of 540 lines, arcs and shapes, not listed
Top Solder:
  drawing of 540 lines, arcs and shapes, not listed
Mechanical 1:
  the board outline again, w0.254

## Text inside footprints (layer, text, board x,y; h text height)
J4: Mechanical 13 "PCB EDGE" at -101.19,-42.88 h0.8 r180
RAMON1: Top Overlay "www.ramonic.com" at -95.75,1.35 h2
RAMON2: Bottom Overlay "www.ramonic.com" at -79.65,20.35 h2